# Altium PCB ASCII-v1.1.PcbDoc (part 2 of 2)
Units mil, origin at the board's own origin, x right, y up, seen from the top; angles counter-clockwise.
Board outline 1175 x 6265 mil, 2 copper layers (Top Layer, Bottom Layer), stack 61.811 mil thick; 67 components, 48 nets, 292 pads, 122 vias.
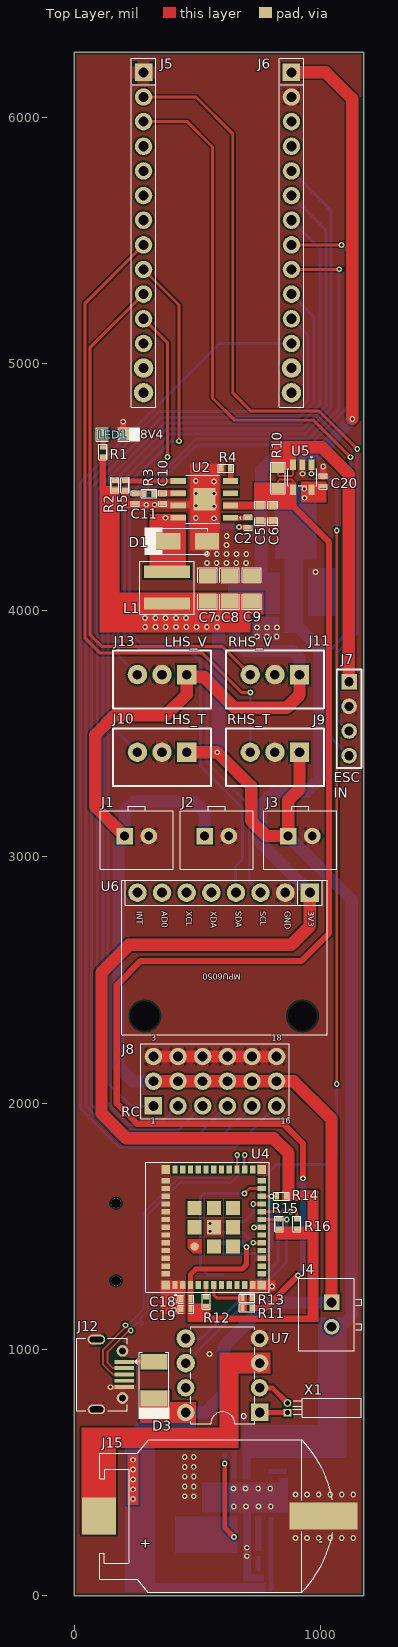
[diagram p0: Top Layer view]

## Via types
v1: diameter 23.62, hole 11.81, Top Layer to Bottom Layer, tented both sides, 68 vias
v2: diameter 23.62, hole 11.81, Top Layer to Bottom Layer, 54 vias

## Nets (pads, with @x,y where several pads share a name; then routed paths per layer and width w, separated by ;. In a path a pad name is that pad's centre, name@x,y a point inside that pad or via, vN(x,y) a via of type N, cw(c..) or ccw(c..) an arc to the next point about the centre after c; other vN are vias at no path point) (continued)
M11: J5.3 J7.4 | length 3276.9
  Top Layer w12: J5.3 459.3,5982.7 561.92,5880.08 561.92,4861.08 652,4771 972,4771 v1(1122,4621)
  Bottom Layer w12: J7.4 1041,3484.62 1041,3840.97 1110.92,3910.89 1122,3921.97 v1(1122,4621)
M12: J6.12 J8.16 | length 4560.6
  Bottom Layer w12: J8.16 654.92,1821.7 181.75,1821.7 25.92,1977.54 25.92,4518.92 589.7,5082.7 J6.12
MISO: J14.7 U4.23 | length 653.3
  Top Layer w12: v1(690.92,1632.7) 711.65,1653.43 U4.23
  Bottom Layer w12: J14.7 543.18,1302.45 513.92,1331.7 513.92,1622.7 523.92,1632.7 v1(690.92,1632.7)
MOSI: J14.3 U4.16 | length 174
  Top Layer w12: v1@728.81,1432.96 U4.16
  Bottom Layer w12: J14.3 684.47,1475.67 v1(726.92,1433.22)
NetC2_1: C2.1 D1.1 L1.1 U2.8 | length 402.2
  Top Layer w20: v1(371,4375) U2.8 ; v1(669.5,4337.5) C2.1
  Bottom Layer w20: v1(371,4375) 408.5,4337.5 v1(669.5,4337.5)
NetC2_2: C2.2 U2.1
NetC10_2: C10.2 R3.1 U2.6
NetC11_2: C11.2 R3.2
NetC12_1: C12.1 D2.1 L2.1 U3.8 | length 402.2
  Top Layer w20: v1(611.5,537.82) 611.5,276.82 v1(649,239.32)
  Bottom Layer w20: v1(611.5,537.82) C12.1@611.5,574.32 ; v1(649,239.32) U3.8
NetC12_2: C12.2 U3.1
NetC16_2: C16.2 R7.2 U3.6
NetC17_2: C17.2 R7.1
NetD3_2: D3.2 J12.1 | length 121.1
  Top Layer w10: D3.2@323.1,949.88 D3.2
  Top Layer w14: J12.1 D3.2@323.1,949.88
NetJ15_2: J15.2 U7.3
NetLED1_1: LED1.1 R1.2 | length 51.5
  Top Layer w20: LED1.1 117.29,4711.99 R1.2@117.29,4661.5
NetR2_1: R2.1 R5.2 U2.5
NetR4_2: R4.2 U2.4
NetR6_1: R6.1 R9.2 U3.5
NetR8_2: R8.2 U3.4
NetR11_2: R11.2 R13.2 U4.6 | length 162.5
  Top Layer w12: U4.6 566.92,1220.7 578.92,1208.7 R13.2
NetR12_2: R12.2 U4.5 | length 49.7
  Top Layer w12: U4.5 535.42,1212.7 R12.2
NetU7_1: U7.1 X1.1 | length 113
  Top Layer w20: U7.1@752.92,743.7 X1.1
NetU7_2: U7.2 X1.2 | length 138.5
  Top Layer w20: U7.2 753.5,844.12 804.88,844.12 X1.2
S+: J7.1 R10.2 U5.3 | length 1246.1
  Top Layer w8: R10.2 826.92,4549.7 831.92,4544.7 883.83,4544.7 888.52,4549.39 U5.3
  Top Layer w50: 890.88,4662 1005,4662 1114.92,4552.08 J7.1@1114.92,3709.7
S-: C5.2 C6.2 R10.1 R11.1 U2.2 U5.4 | length 4942.6
  Top Layer w8: R10.1 826.92,4523.7 832.92,4529.7 883.92,4529.7 889.92,4523.7 U5.4@889.92,4489.92
  Top Layer w25: 732.92,1168.7 776.92,1168.7 v1(908.92,1300.7) ; 893,4417 1035,4275 1035,2688.78 923.22,2577 271,2577 173,2479 173,1998.62 255.62,1916 849,1916 928.92,1836.08 v1(928.92,1694.7)
  Bottom Layer w25: v1(908.92,1300.7) 928.92,1320.7 v1(928.92,1694.7)
SCL: R15.1 U4.19 U7.6 | length 848.7
  Top Layer w12: U4.19 R15.1@826.67,1527.45 ; R15.1 v1(862.92,1527.7)
  Bottom Layer w12: U7.6 862.92,1354.7 v1(862.92,1527.7)
SCLK: J14.5 R14.1 U4.22 | length 476
  Top Layer w12: U4.22 823.19,1621.93 R14.1
  Bottom Layer w12: J14.5 773.28,1389.06 801.92,1417.7 v1(801.92,1621.7)
SDA: R16.1 U4.20 U7.5 | length 931.9
  Top Layer w12: U4.20 v1@878.16,1558.94 ; v1(878.92,1559.7) 896.92,1559.7 903.92,1552.7 R16.1
  Bottom Layer w12: U7.5 515.92,1044.7 826.92,1355.7 826.92,1546.7 850.92,1570.7 871.92,1570.7 878.92,1563.7 v1(878.92,1559.7)
USB_D_N: J12.2 U4.26 | length 1368.5
  Top Layer w8: J12.2 157.33,924.29 135.92,945.7 135.92,991.7 220.96,1076.74 v1(229.88,1076.74) ; v1(692.47,1788.7) 692.47,1730.64 U4.26
  Bottom Layer w8: v1(229.88,1076.74) 229.88,1085.67 238.11,1093.9 250.14,1105.92 cw(c255.79,1100.26) 261.45,1105.92 267.17,1100.2 ccw(c271.77,1104.8) 276.36,1100.2 ccw(c271.77,1104.8) 276.36,1109.39 270.64,1115.11 cw(c276.3,1120.77) 270.64,1126.43 288.36,1144.14 299.92,1155.7 299.92,1547.7 429.92,1677.7 638.62,1677.7 686.16,1725.25 686.16,1782.39 v1(692.47,1788.7)
USB_D_P: J12.3 U4.27 | length 1368.7
  Top Layer w8: J12.3 157.46,898.7 117.92,938.25 117.92,999.16 208.23,1089.47 v1(208.23,1098.39) ; U4.27 661.85,1730.64 v1(661.85,1788.7)
  Bottom Layer w8: v1(208.23,1098.39) 217.15,1098.39 281.92,1163.16 281.92,1555.16 422.46,1695.7 631.16,1695.7 668.16,1732.7 668.16,1782.39 v1(661.85,1788.7)
VIN: C3.2 C4.2 C15.2 C21.2 C22.2 D3.1 J1.1 J2.1 J4.1 J6.1 J8.2 J8.5 J8.8 J8.11 J8.14 J8.17 J11.1 J13.1 L2.2 R6.2 U1.3 U7.8 | length 8855
  Top Layer w50: J1.1 85.92,3202.69 85.92,3494.7 163.92,3572.7 370.92,3572.7 456.92,3658.7 J13.1@456.92,3748.7 ; J8.2 J8.5 J8.8 J8.11 J8.14 J8.17 890.92,2088.7 1044.92,1934.7 J4.1 ; J13.1 464.92,3730.7 524.92,3730.7 651.92,3603.7 861.92,3603.7 914.91,3656.69 J11.1 ; J6.1 1021.3,6182.7 1128.92,6075.08 v1(1128.92,4775.7)
  Bottom Layer w50: J8.2 236.92,2088.7 179.92,2145.7 179.92,3023.37 cw(c265.24,3023.37) J1.1 204.91,3186.69 241.92,3223.7 486.92,3223.7 529.49,3181.13 J2.1 ; U7.8 533.92,744.7 608.92,819.7 608.92,1013.7 786.13,1190.91 J4.1 ; U1.3@773.92,4107.07 U1.3@786.37,4094.62 ; J11.1 914.91,3805.71 885.92,3834.7 695.92,3834.7 650.92,3879.7 650.92,3999.7 758.92,4107.7 758.92,4566.92 822,4630 983.22,4630 v1(1128.92,4775.7)
  other v1: 239.48,392.72 239.48,432.6 239.48,472.48 239.48,512.36 239.48,552.24
pads on no net: J5.4 J5.5 J5.6 J5.7 J5.12 J5.13 J5.14 J6.3 J6.4 J6.13 J6.14 J12.4 J14. J14.1 J14.8 J14.9 U2.3 U3.3 U4.4 U4.7 U4.8 U4.9 U4.10 U4.12 U4.13 U4.15 U4.17 U4.24 U4.25 U4.28 U4.29 U4.30 U4.31 U4.32 U4.33 U4.34 U4.35 U4.54 U4.55 U4.56 U4.57 U4.58 U4.59 U4.60 U4.61 U6. U6.5 U6.6 U6.7 U6.8 U7.7

## Polygon pours and split planes (outlines as drawn)
GND on Top Layer "GND_L01_P000" (solid, remove dead copper, pour order 0): 0,5005 0,6265 1175,6265 1175,0 0,0
GND on Bottom Layer "GND_L02_P001" (solid, remove dead copper, pour order 1): 0,5005 0,6265 1175,6265 1175,0 0,0

## Other copper
Top Layer:
  region net NetJ15_2: 798,902 798,987 590,987 590,902
  rectangle net NetJ15_2: 590,605 668,978
  region net NetJ15_2: 31,683 31,601 667,601 667,683
  region net NetJ15_2: 171,652 31,652 31,249 171,249
  rectangle net VIN: 216,369.32 261,573
  region net NetC2_1: 306.68,4390 306.68,4135.61 440,4135.61 440,4390
  region net NetC2_1: 343.68,4390 343.68,4135 453.63,4135 453.63,4390
  region net GND: 591,4595 470,4595 470,4242 591,4242
  region net GND: 610,4595 570,4595 570,4560 610,4560
  region net 8V4: 282,3909 282,4072 104,4072 104,3909
  region net 8V4: 183.35,4505 104,4505 104,4047 183.35,4047
  rectangle net 8V4: 104,4478.92 130,4632.7
  rectangle net 8V4: 269,3909 716,4053
  rectangle net 8V4: 269,3983 769,4072.02
  region net GND: 195,4443 195,4412 516,4412 516,4443
  rectangle net GND: 192,4412 219.27,4498
  region net NetC11_2: 233.68,4483.15 233.68,4462.73 294,4462.73 294,4483.15
  region net NetR2_1: 452.32,4514.85 452.32,4535.27 153,4535.27 153,4514.85
  region net NetC10_2: 313,4487 313,4460.74 453,4460.74 453,4487
  region net 8V4: 183.08,4476 183.08,4505 104,4505 104,4476
  rectangle net S-: 730,4409 903,4518
  region net S-: 604.68,4442 604.68,4409 825,4409 825,4442
  region net NetR4_2: 646,4590 625.58,4590 625.58,4515.6 646,4515.6
  region net NetC2_2: 605,4385.15 605,4364.74 722,4364.74 722,4385.15
  rectangle net S+: 797.92,4556 853,4576.7
  rectangle net GND: 711.92,1238.7 816.92,1280.7
  rectangle net GND: 711.92,1195.7 731.92,1280.7
  rectangle net GND: 350.92,1144.7 451.92,1280.7
  rectangle net 3V3: 463.92,1110.7 984.92,1138.7
  rectangle net 3V3: 843.92,1601.7 984.92,1644.7
  rectangle net 3V3: 946.92,1110.7 991,1644.7
  rectangle net 3V3: 817.92,1446.7 984.92,1499.7
  rectangle net S+: 797.92,4569.14 900.92,4687
  rectangle net 3V3: 920,4438 1023.92,4521.7
  rectangle net 3V3: 460.92,1110.7 553.92,1186.7
  rectangle net 3V3: 460.92,1110.7 484.92,1280.7
  rectangle net NetR11_2: 669.92,1152.7 701.92,1221.7
  rectangle net VIN: 267.92,700.7 493.92,786.7
  rectangle net VIN: 267.92,700.7 388.92,832.7
Bottom Layer:
  rectangle net GND: 950,3977 1060,4171
  region net NetC12_1: 664,321.95 409,321.95 409,212 664,212
  region net VIN: 281.5,576.5 417,712 341.65,787.35 206.15,651.85
  rectangle net VIN: 341,686 493.92,787
  region net VIN: 328,15 328,652 206,652 206,15
  region net VIN: 319,51.67 319,15 777,15 777,51.67
  region net 8V4: 1106,1129.76 990,1129.76 990,559 1106,559
  rectangle net 8V4: 683,559 1083,693.32
  region net NetC12_1: 664,308.32 409.61,308.32 409.61,175 664,175
  region net 8V4: 613,3910 613,3992 271,3992 271,3910
  region net NetR8_2: 789.6,514.32 789.6,493.9 864,493.9 864,514.32
  region net NetC12_2: 659.15,588.32 638.74,588.32 638.74,473.32 659.15,473.32
  region net GND: 834,478.32 834,438.32 869,438.32 869,478.32
  region net GND: 520,459.32 520,338.32 869,338.32 869,459.32
  region net 8V4: 716,693.32 683,693.32 683,473 716,473
  region net NetC16_2: 761,321.32 734.74,321.32 734.74,181.32 761,181.32
  rectangle net NetR6_1: 788.85,21.32 809.27,320.64
  region net NetC17_2: 757.15,162.32 736.73,162.32 736.73,102 757.15,102
  region net GND: 770.08,60.32 770.08,87.59 686,87.59 686,60.32
  region net GND: 717,384.32 686,384.32 686,63.32 717,63.32
  rectangle net VIN: 624.92,3984.7 835,4152.7
  rectangle net GND: 719.92,3875.7 832.92,3973.7
  rectangle net GND: 690.92,3939.7 832.92,3973.7
  rectangle net 8V4: 558.92,3399 612,3981
  rectangle net 3V3: 853.92,3907.7 930.92,4234.7
  rectangle net 3V3: 815.92,4205.7 984,4509

## Silkscreen, mask and mechanical layers (free items; w line width, h text height)
Top Overlay:
  text "8V4" at 267.94,4683.33 h60
  text "LHS_V" at 366.92,3852.37 h40
  text "RHS_V" at 625.91,3852.37 h40
  text "LHS_T" at 366.92,3537.37 h40
  text "RHS_T" at 621.23,3537.37 h40
  text "ESC" at 1054,3302 h40
  text "IN" at 1054,3239.27 h40
  text "RC" at 191.92,1944.7 h40
Bottom Overlay:
  lines w8: 771,169 798,169
  text "ASCII - v1.1" at 762.33,6192.24 h70
  text "10V" at 1165,3772.17 h100
  text "GND" at 1053.02,3589.19 h100
  text "G11" at 1058,3483 h100
  text "M11" at 1165,3294 h100
Board Outline:
  the board outline again, w10
Fabrication:
  drawing of 191 lines, arcs and shapes, not listed
  text "Layer" at 1604.74,2206 h60
  text "Name" at 2014.65,2206 h60
  text "Material" at 2944.4,2206 h60
  text "Thickness" at 3804.16,2206 h60
  text "Constant" at 4454,2206 h60
  text "Board Layer Stack" at 5023.86,2206 h60
  text "Top Overlay" at 2014.65,2086 h60
  text "Top Solder" at 2014.65,1966 h60
  text "Solder Resist" at 2944.4,1966 h60
  text "0.39mil" at 3804.16,1966 h60
  text "3.5" at 4454,1966 h60
  text "1" at 1604.74,1846 h60
  text "Top Layer" at 2014.65,1846 h60
  text "1.38mil" at 3804.16,1846 h60
  text "Dielectric 1" at 2014.65,1726 h60
  text "FR-4" at 2944.4,1726 h60
  text "59.06mil" at 3804.16,1726 h60
  text "4.8" at 4454,1726 h60
  text "2" at 1604.74,1606 h60
  text "Bottom Layer" at 2014.65,1606 h60
  text "1.38mil" at 3804.16,1606 h60
  text "Bottom Solder" at 2014.65,1486 h60
  text "Solder Resist" at 2944.4,1486 h60
  text "0.39mil" at 3804.16,1486 h60
  text "3.5" at 4454,1486 h60
  text "Bottom Overlay" at 2014.65,1366 h60
  text "Total board thickness:" at 1604.74,1246 h60
  text "62.60mil" at 3804.16,1246 h60
Drill Drawing:
  drawing of 152 lines, arcs and shapes, not listed
  text "Symbol" at 1687.73,5320 h72
  text "Count" at 2193.61,5320 h72
  text "Hole Size" at 2783.45,5320 h72
  text "Plated" at 3903.12,5320 h72
  text "Hole Type" at 4409,5320 h72
  text "Drill Layer Pair" at 5142.8,5320 h72
  text "Via/Pad" at 6642.35,5320 h72
  text "Pad Shape" at 7232.2,5320 h72
  text "Template" at 7978,5320 h72
  text "Hole Length" at 8947.72,5320 h72
  text "Routed Path Length" at 10027.41,5320 h72
  text "122" at 2193.61,5170 h60
  text "11.81mil (0.300mm)" at 2783.45,5170 h60
  text "PTH" at 3903.12,5170 h60
  text "Round" at 4409,5170 h60
  text "Top Layer - Bottom Layer" at 5142.8,5170 h60
  text "Via" at 6642.35,5170 h60
  text "Rounded" at 7232.2,5170 h60
  text "(Mixed)" at 7978,5170 h60
  text "-" at 8947.72,5170 h60
  text "-" at 10027.41,5170 h60
  text "2" at 2193.61,5020 h60
  text "19.69mil (0.500mm)" at 2783.45,5020 h60
  text "PTH" at 3903.12,5020 h60
  text "Round" at 4409,5020 h60
  text "Top Layer - Bottom Layer" at 5142.8,5020 h60
  text "Pad" at 6642.35,5020 h60
  text "(Mixed)" at 7232.2,5020 h60
  text "(Mixed)" at 7978,5020 h60
  text "-" at 8947.72,5020 h60
  text "-" at 10027.41,5020 h60
  text "2" at 2193.61,4870 h60
  text "23.62mil (0.600mm)" at 2783.45,4870 h60
  text "PTH" at 3903.12,4870 h60
  text "Slot" at 4409,4870 h60
  text "Top Layer - Bottom Layer" at 5142.8,4870 h60
  text "Pad" at 6642.35,4870 h60
  text "Rounded" at 7232.2,4870 h60
  text "(Mixed)" at 7978,4870 h60
  text "55.12mil (1.400mm)" at 8947.72,4870 h60
  text "31.50mil (0.800mm)" at 10027.41,4870 h60
  text "2" at 2193.61,4720 h60
  text "27.56mil (0.700mm)" at 2783.45,4720 h60
  text "PTH" at 3903.12,4720 h60
  text "Round" at 4409,4720 h60
  text "Top Layer - Bottom Layer" at 5142.8,4720 h60
  text "Pad" at 6642.35,4720 h60
  text "Rounded" at 7232.2,4720 h60
  text "(Mixed)" at 7978,4720 h60
  text "-" at 8947.72,4720 h60
  text "-" at 10027.41,4720 h60
  text "6" at 2193.61,4570 h60
  text "35.43mil (0.900mm)" at 2783.45,4570 h60
  text "PTH" at 3903.12,4570 h60
  text "Round" at 4409,4570 h60
  text "Top Layer - Bottom Layer" at 5142.8,4570 h60
  text "Pad" at 6642.35,4570 h60
  text "(Mixed)" at 7232.2,4570 h60
  text "(Mixed)" at 7978,4570 h60
  text "-" at 8947.72,4570 h60
  text "-" at 10027.41,4570 h60
  text "4" at 2193.61,4420 h60
  text "37.40mil (0.950mm)" at 2783.45,4420 h60
  text "PTH" at 3903.12,4420 h60
  text "Round" at 4409,4420 h60
  text "Top Layer - Bottom Layer" at 5142.8,4420 h60
  text "Pad" at 6642.35,4420 h60
  text "(Mixed)" at 7232.2,4420 h60
  text "(Mixed)" at 7978,4420 h60
  text "-" at 8947.72,4420 h60
  text "-" at 10027.41,4420 h60
  text "2" at 2193.61,4270 h60
  text "39.37mil (1.000mm)" at 2783.45,4270 h60
  text "NPTH" at 3903.12,4270 h60
  text "Round" at 4409,4270 h60
  text "Top Layer - Bottom Layer" at 5142.8,4270 h60
  text "Pad" at 6642.35,4270 h60
  text "Rounded" at 7232.2,4270 h60
  text "c100hn100p100" at 7978,4270 h60
  text "-" at 8947.72,4270 h60
  text "-" at 10027.41,4270 h60
  text "22" at 2193.61,4120 h60
  text "39.37mil (1.000mm)" at 2783.45,4120 h60
  text "PTH" at 3903.12,4120 h60
  text "Round" at 4409,4120 h60
  text "Top Layer - Bottom Layer" at 5142.8,4120 h60
  text "Pad" at 6642.35,4120 h60
  text "(Mixed)" at 7232.2,4120 h60
  text "(Mixed)" at 7978,4120 h60
  text "-" at 8947.72,4120 h60
  text "-" at 10027.41,4120 h60
  text "18" at 2193.61,3970 h60
  text "40.16mil (1.020mm)" at 2783.45,3970 h60
  text "PTH" at 3903.12,3970 h60
  text "Round" at 4409,3970 h60
  text "Top Layer - Bottom Layer" at 5142.8,3970 h60
  text "Pad" at 6642.35,3970 h60
  text "(Mixed)" at 7232.2,3970 h60
  text "(Mixed)" at 7978,3970 h60
  text "-" at 8947.72,3970 h60
  text "-" at 10027.41,3970 h60
  text "8" at 2193.61,3820 h60
  text "40.20mil (1.021mm)" at 2783.45,3820 h60
  text "PTH" at 3903.12,3820 h60
  text "Round" at 4409,3820 h60
  text "Top Layer - Bottom Layer" at 5142.8,3820 h60
  text "Pad" at 6642.35,3820 h60
  text "(Mixed)" at 7232.2,3820 h60
  text "(Mixed)" at 7978,3820 h60
  text "-" at 8947.72,3820 h60
  text "-" at 10027.41,3820 h60
  text "28" at 2193.61,3670 h60
  text "41.34mil (1.050mm)" at 2783.45,3670 h60
  text "PTH" at 3903.12,3670 h60
  text "Round" at 4409,3670 h60
  text "Top Layer - Bottom Layer" at 5142.8,3670 h60
  text "Pad" at 6642.35,3670 h60
  text "(Mixed)" at 7232.2,3670 h60
  text "(Mixed)" at 7978,3670 h60
  text "-" at 8947.72,3670 h60
  text "-" at 10027.41,3670 h60
  text "2" at 2193.61,3520 h60
  text "118.11mil (3.000mm)" at 2783.45,3520 h60
  text "NPTH" at 3903.12,3520 h60
  text "Round" at 4409,3520 h60
  text "Top Layer - Bottom Layer" at 5142.8,3520 h60
  text "Pad" at 6642.35,3520 h60
  text "Rounded" at 7232.2,3520 h60
  text "c0hn300m0mx0p-1" at 7978,3520 h60
  text "-" at 8947.72,3520 h60
  text "-" at 10027.41,3520 h60
  text "218 Total" at 2193.61,3370 h60
  text "Slot definitions :" at 1687.73,3225.03 h60
  text "Routed Path Length" at 2720.42,3225.03 h60
  text "= Calculated from tool start centre position to tool end centre position." at 3823.09,3225.03 h60
  text "Hole Length" at 2720.42,3125.05 h60
  text "= Routed Path Length + Tool Size = Slot length as defined in the PCB layout" at 3413.22,3125.05 h60

## Dimensions
0,6265 to 0,0 on Dimensions
1175,6265 to 0,6265 on Dimensions

## Text inside footprints (layer, text, board x,y; h text height)
J8: Top Overlay "1" at 310.92,1908.7 h40; Top Overlay "16" at 838.92,1908.7 h40; Top Overlay "3" at 312.92,2245.7 h40; Top Overlay "18" at 801.92,2245.7 h40
J15: Top Overlay "-" at 1010.16,232.18 h40 r180; Top Overlay "+" at 313.86,228.82 h40 r180
U6: Top Overlay "MPU6050" at 676.92,2533.7 h40 r180; Top Overlay "INT" at 246.92,2778.7 h40 r270; Top Overlay "AD0" at 346.92,2778.7 h40 r270; Top Overlay "XCL" at 446.92,2778.7 h40 r270; Top Overlay "XDA" at 546.92,2778.7 h40 r270; Top Overlay "SDA" at 646.92,2778.7 h40 r270; Top Overlay "SCL" at 746.92,2778.7 h40 r270; Top Overlay "GND" at 846.92,2778.7 h40 r270; Top Overlay "3V3" at 942.23,2778.7 h40 r270